# Altium PCB SENSEI_Debug-Board.PcbDoc (part 1 of 2)
Units mm, origin at the board's own origin, x right, y up, seen from the top; angles counter-clockwise.
Board outline 148 x 140 mm, 4 copper layers (Top Layer, GND/PWR1, GND/PWR2, Bottom Layer), stack 0.626 mm thick; 55 components, 116 nets, 460 pads, 677 vias.
Unrouted connection lines stored in the file: 54.
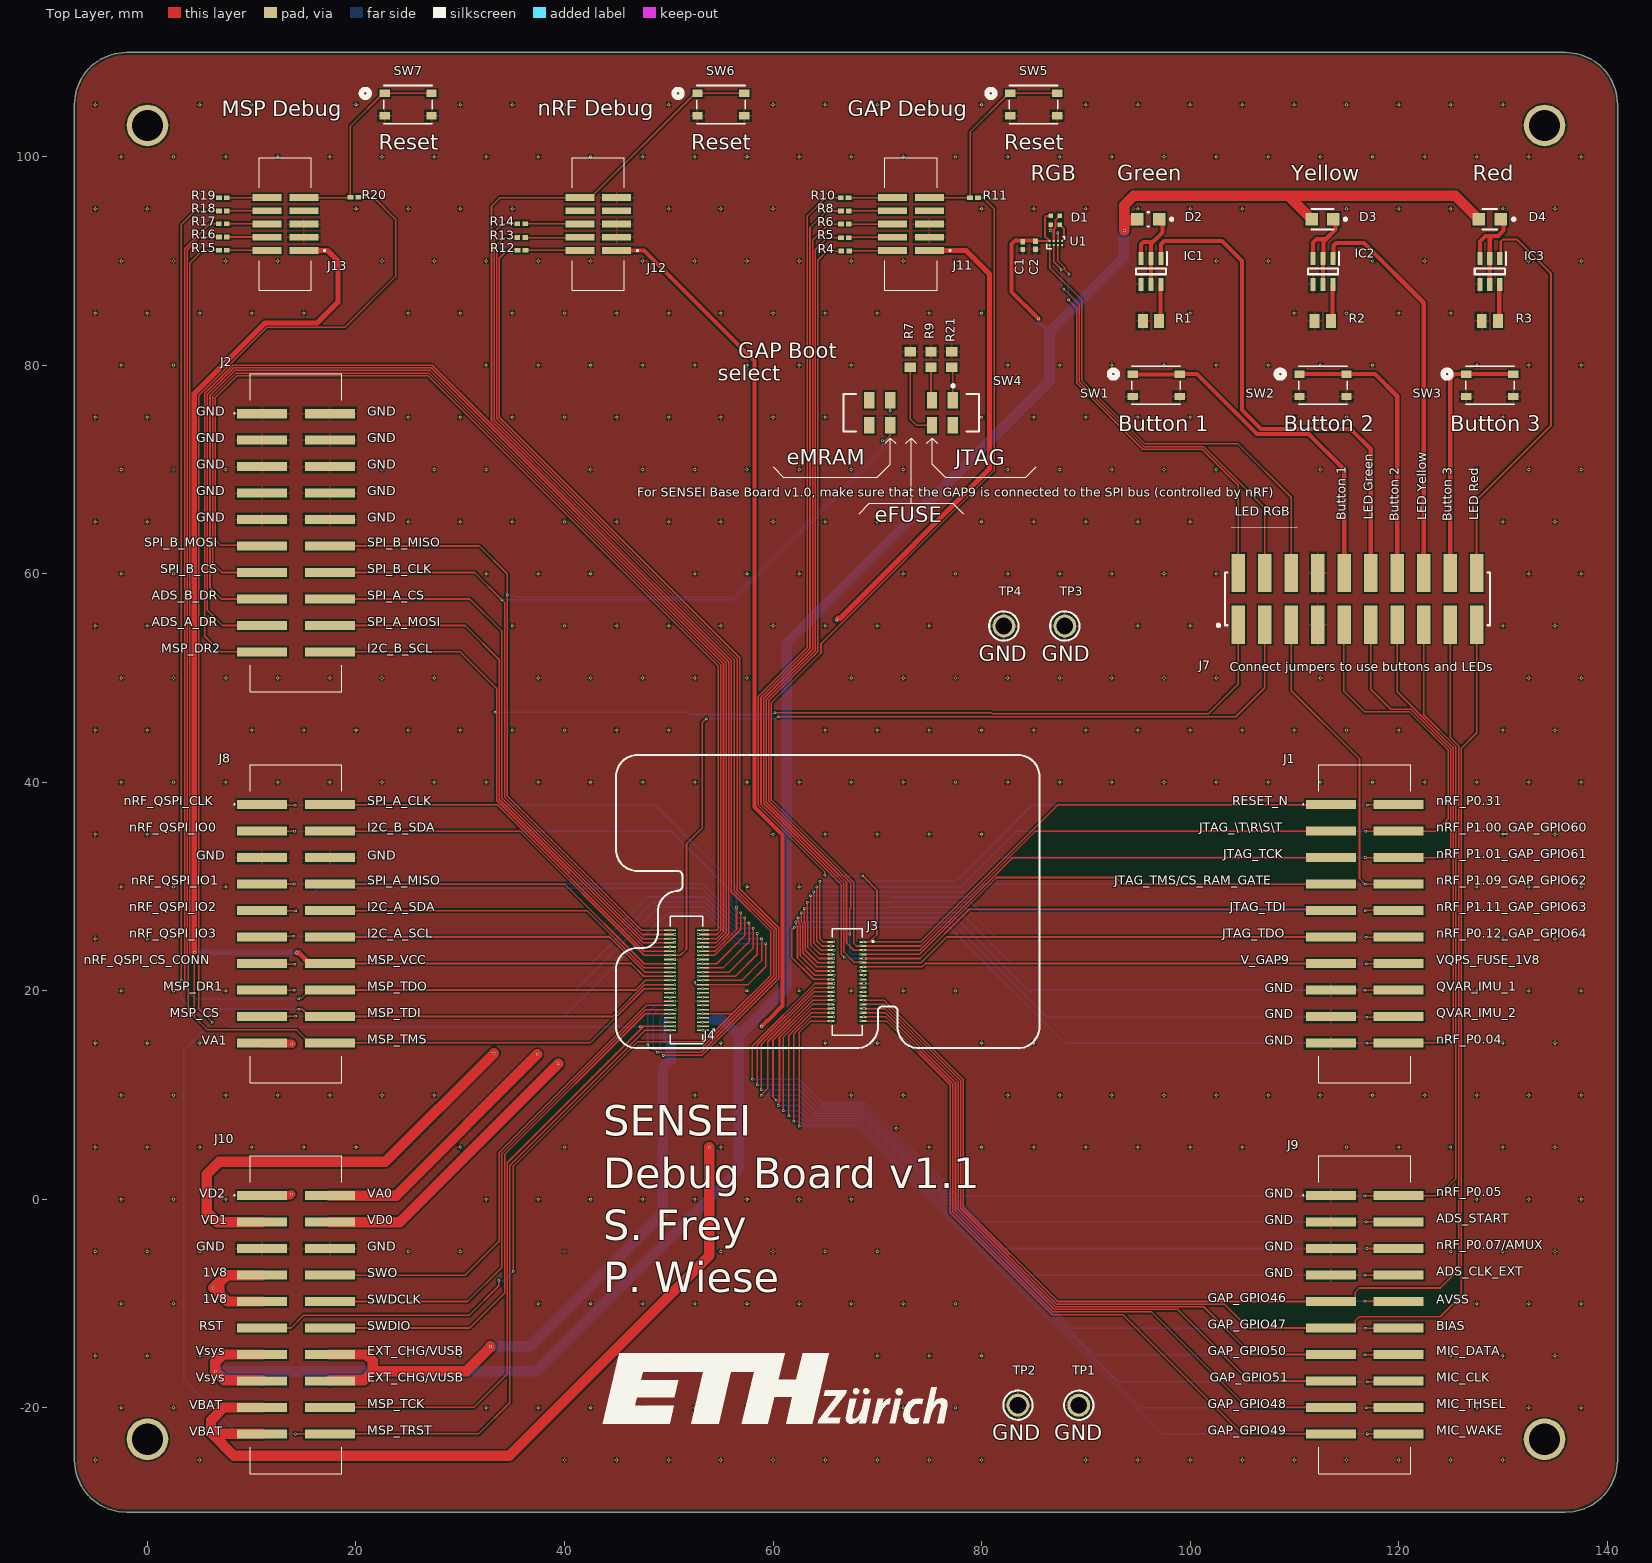
[diagram p0: Top Layer view]
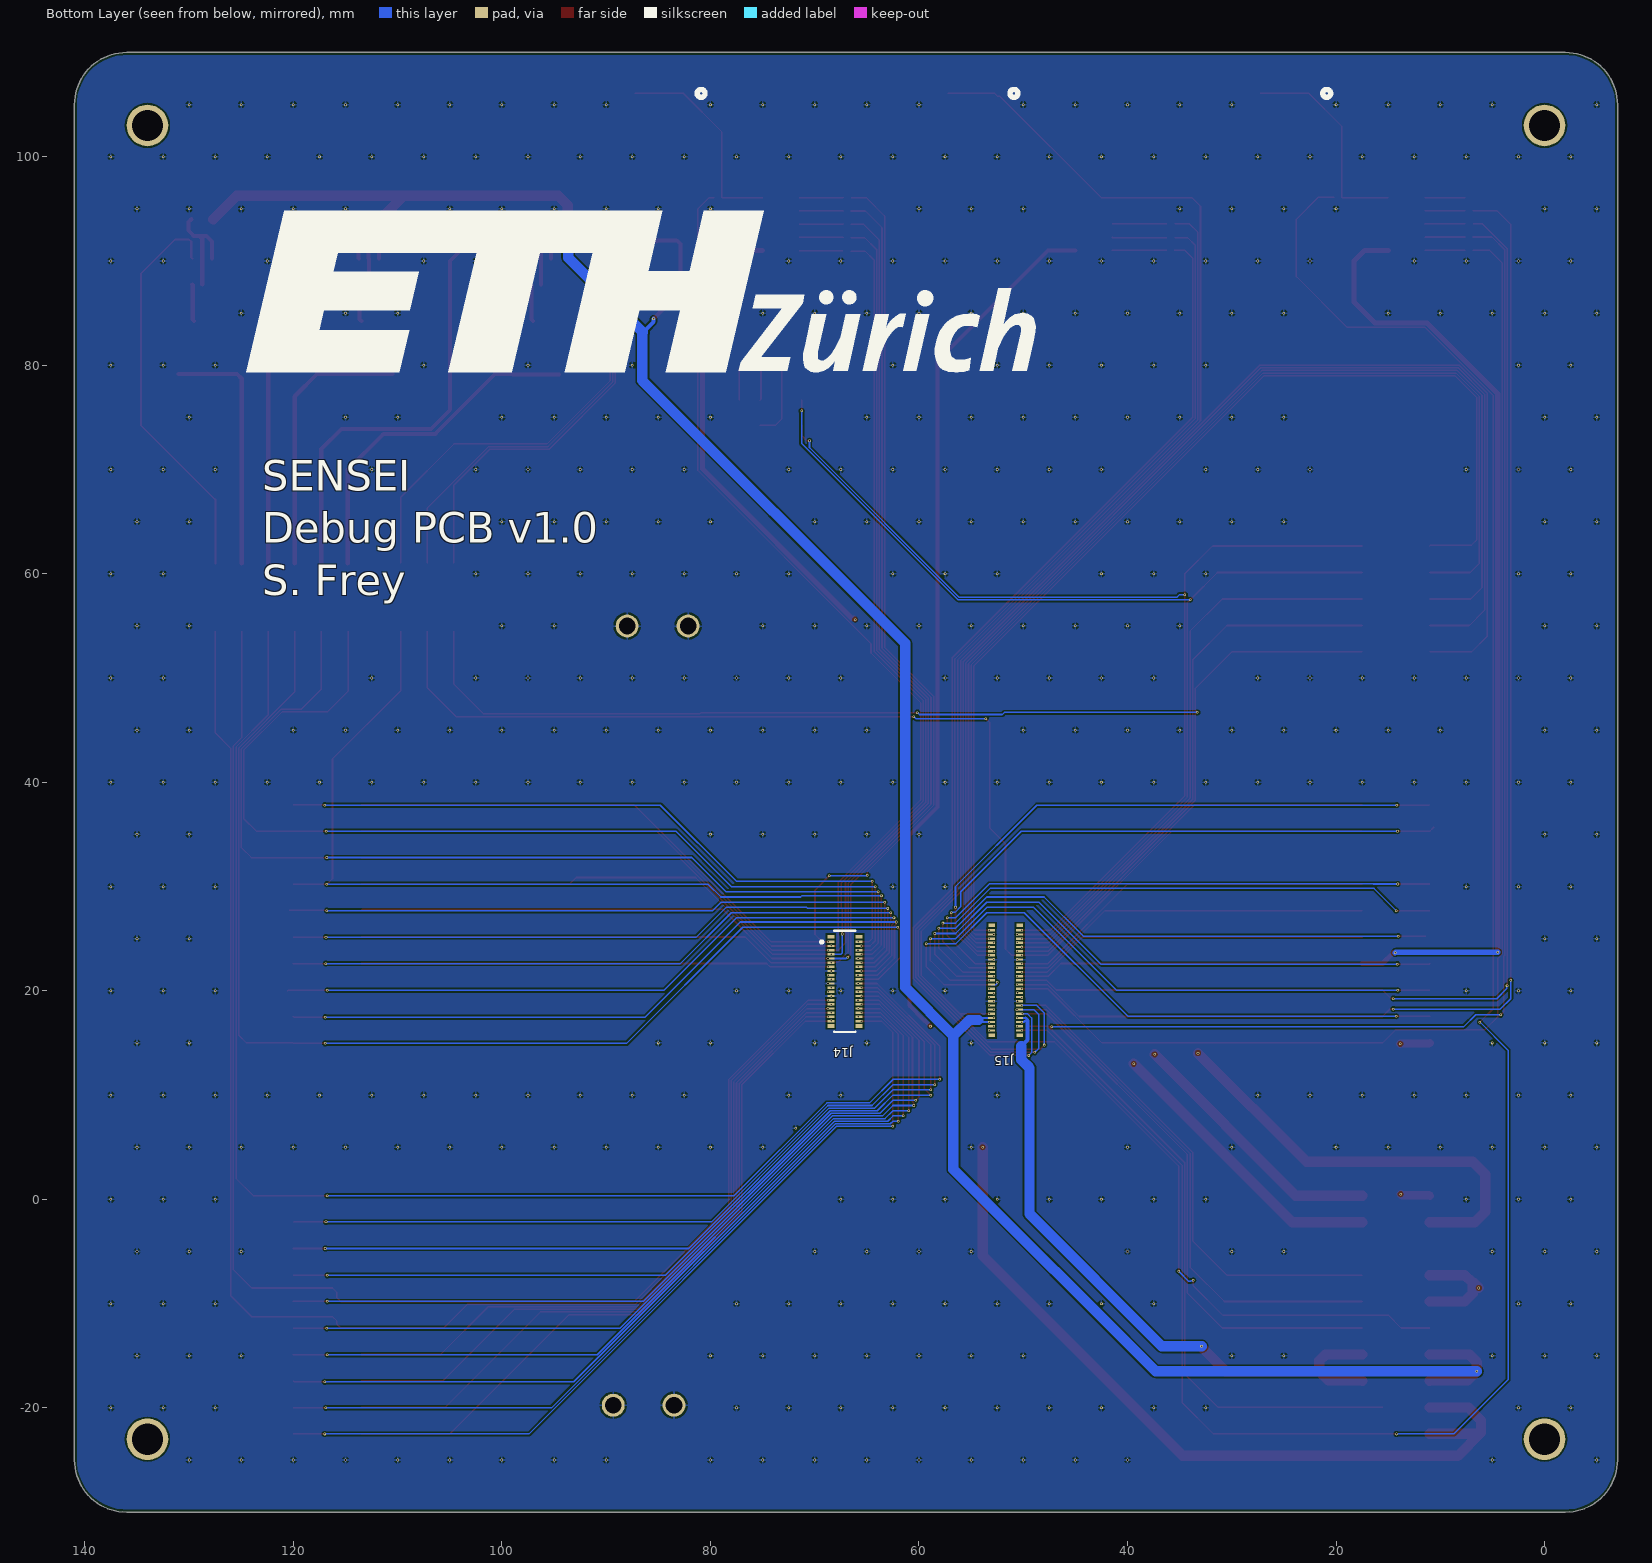
[diagram p1: Bottom Layer view, seen from below]
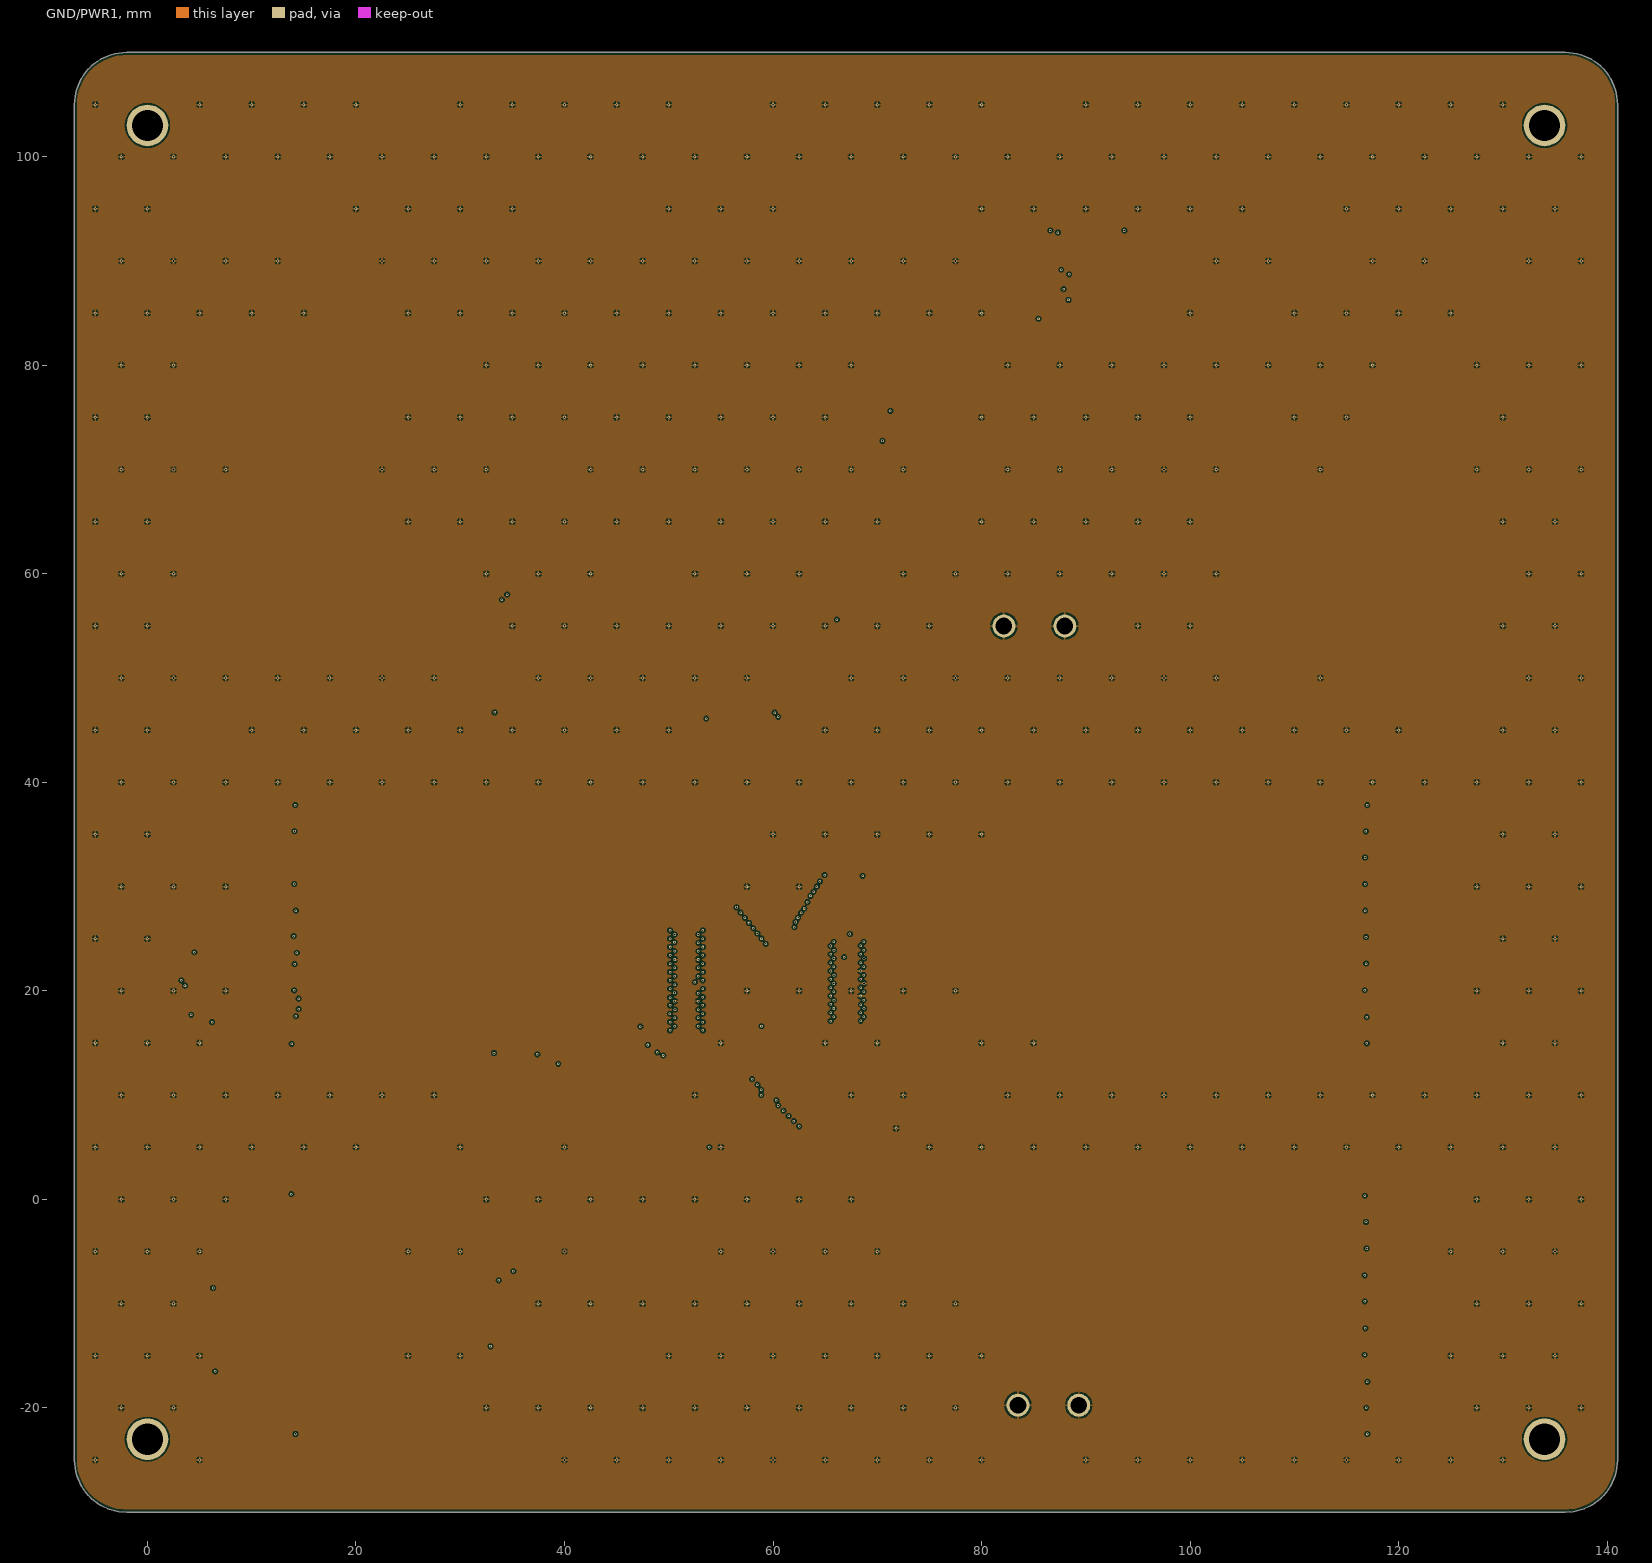
[diagram p2: GND/PWR1]
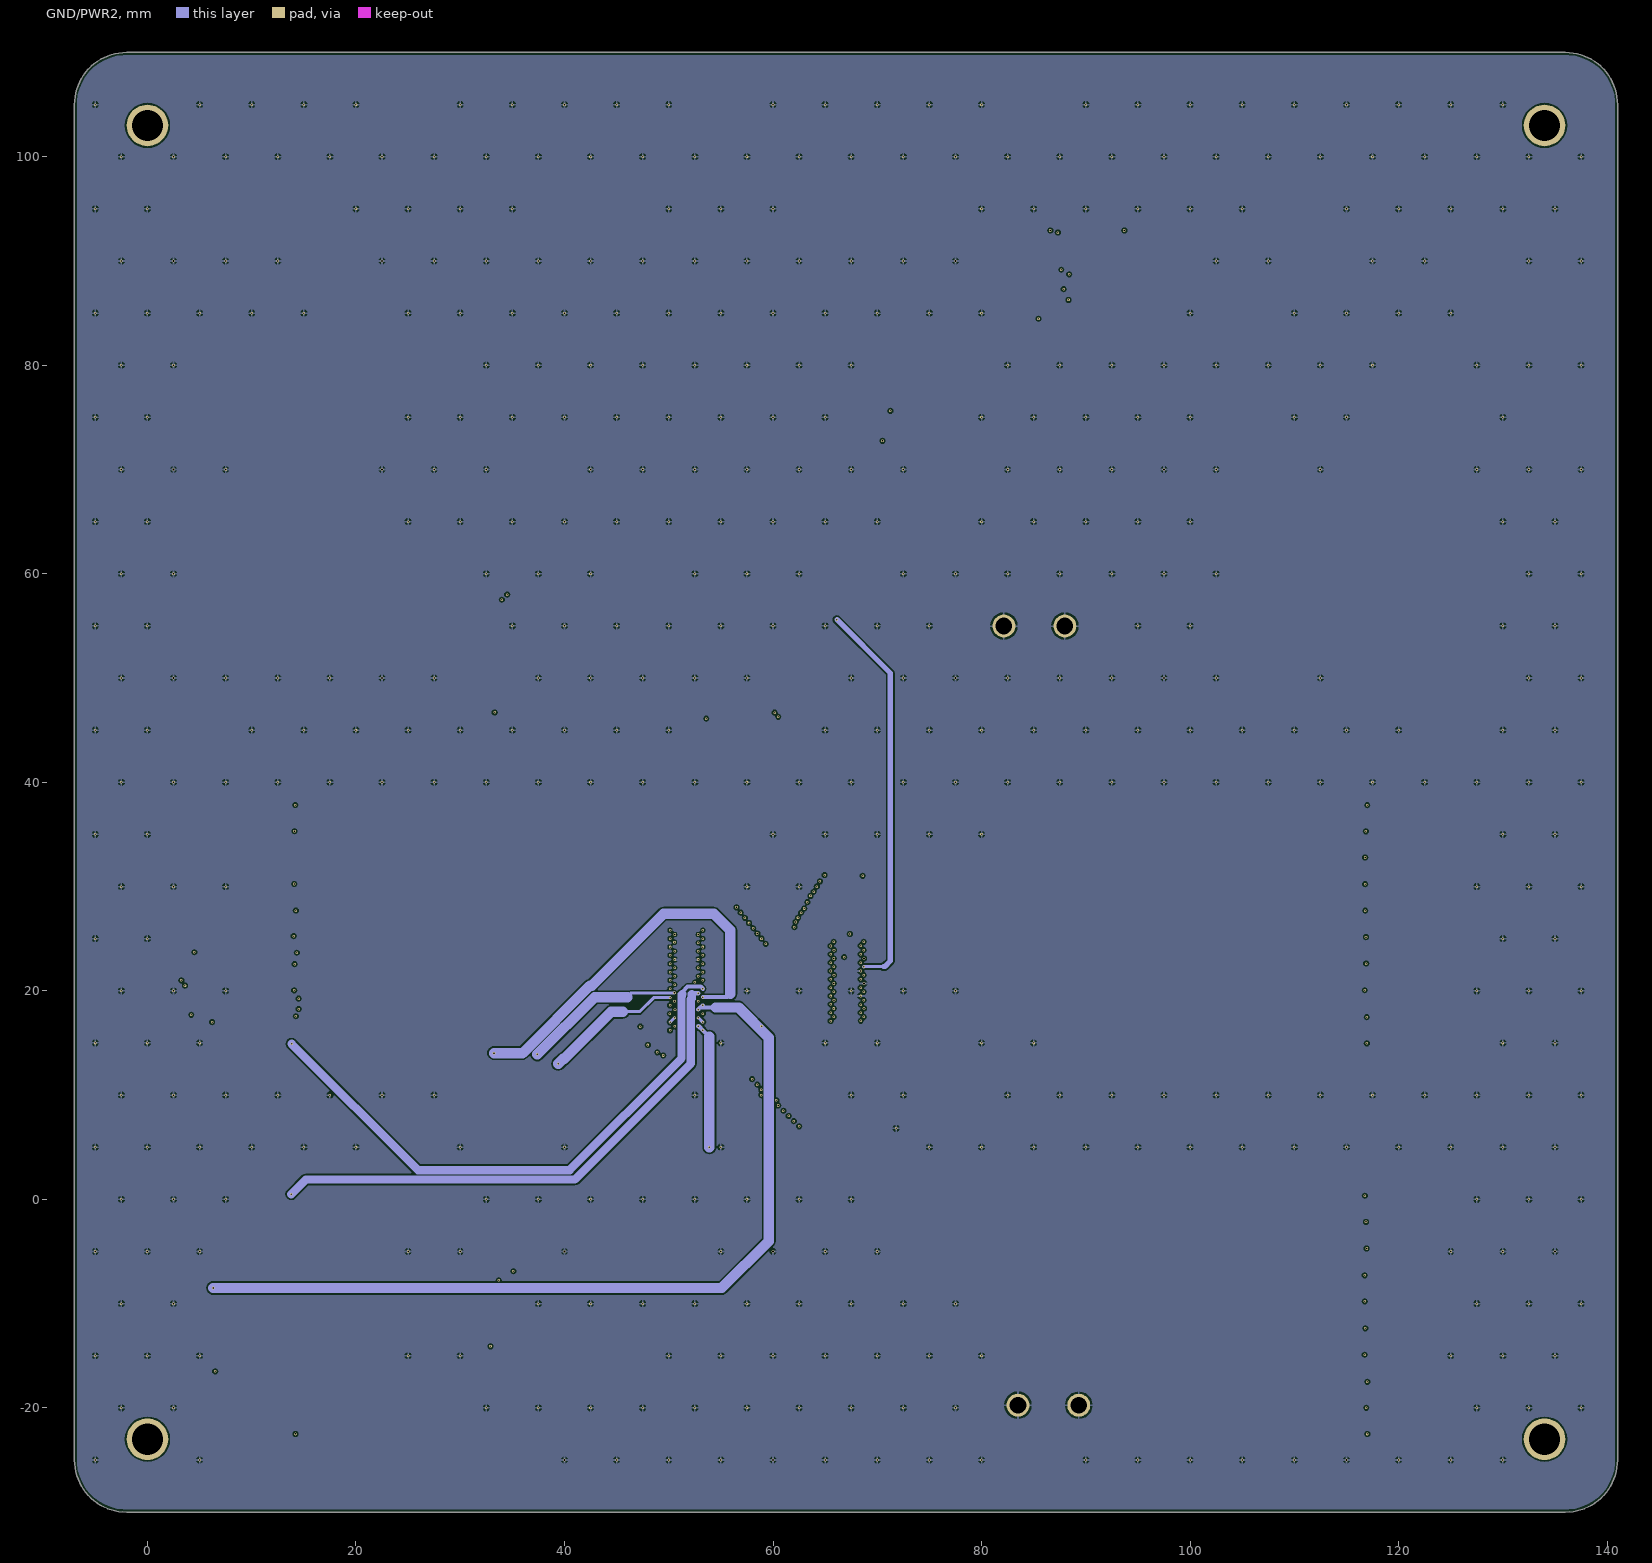
[diagram p3: GND/PWR2]
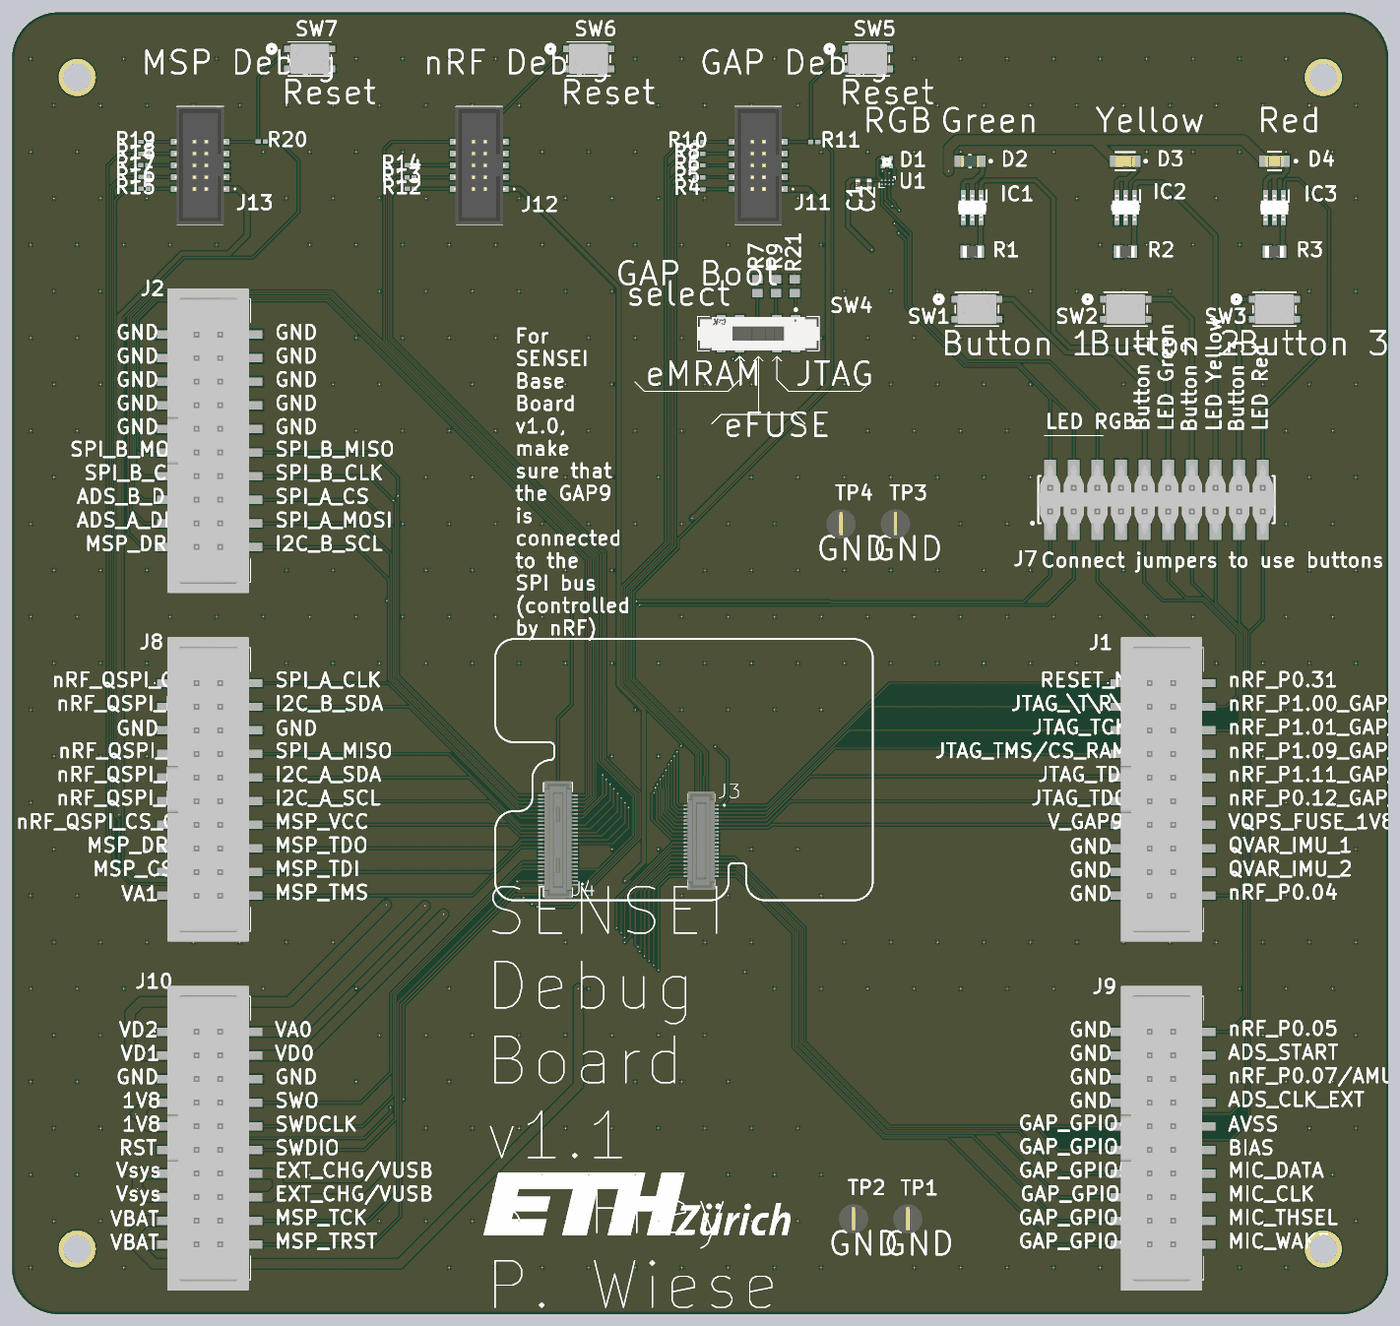
[diagram p5: 3D render of the assembled board from above, using the file's embedded part models]

## Layer stack, top to bottom
Top Solder: solder mask 0.0102, Solder Resist, Dk 3.5
Top Layer: signal copper 0.0175
Dielectric1: prepreg 0.13, PP-021, Dk 4.27
GND/PWR1: signal copper 0.0356
Dielectric2: core 0.13, Core-023, Dk 4.6
Dielectric 3: core 0.13, Core-023, Dk 4.6
GND/PWR2: signal copper 0.0356
Dielectric 4: prepreg 0.13, PP-021, Dk 4.27
Bottom Layer: signal copper 0.0175
Board Layer Stack Bottom Solder: solder mask 0.0102, Solder Resist, Dk 3.5

## Board outline
-2,-30 cw(c-2,-25) -7,-25 -7,105 cw(c-2,105) -2,110 136,110 cw(c136,105) 141,105 141,-25 cw(c136,-25) 136,-30

## Design rules (kind name [scope] priority, off if disabled: settings)
BoardOutlineClearance [All] p1: gap=0.25 ignorepadtopadclearanceinfootprint=FALSE except(0: Arc-SplitContinuation Track-SplitContinuation SMDPad-SplitContinuation THPad-SplitContinuation Via-SplitContinuation Fill-SplitContinuation Poly-SplitContinuation Region-SplitContinuation Text-SplitContinuation)
Clearance Clearance_D100_CLK [InNetClass('CSI2_CLK') vs Not( InNetClass('CSI2_CLK') OR InNet('GND'))] p1: gap=0.4 ignorepadtopadclearanceinfootprint=TRUE
Clearance Clearance_D100_DATA [InNetClass('CSI2_DATA') vs Not( InNetClass('CSI2_DATA') OR InNet('GND'))] p2: gap=0.4 ignorepadtopadclearanceinfootprint=TRUE
Clearance Clearance_S50 [InNetClass('50Ohm') vs Not( InNetClass('50Ohm') OR InNet('GND') or Keepout )] p3: gap=0.4 ignorepadtopadclearanceinfootprint=TRUE
Clearance Clearance-xPP-xTP-xTT [All] p4: gap=0.1 ignorepadtopadclearanceinfootprint=TRUE except(0.15: Arc-Fill Arc-Poly Arc-Region Track-Fill Track-Poly Track-Region SMDPad-Fill SMDPad-Poly SMDPad-Region THPad-Fill THPad-Poly THPad-Region Via-Fill Via-Poly Via-Region Fill-Fill Fill-Poly Fill-Region Poly-Poly Poly-Region Region-Region)
ComponentClearance ComponentClearance_Mechanical [OnMechanical] p1: gap=0 collisioncheckmode=3 verticalgap=0 showdistances=FALSE
ComponentClearance [All] p2: gap=0.1 collisioncheckmode=3 verticalgap=0.1 showdistances=FALSE
DiffPairsRouting [All] p1: maxlimit=0.25 minlimit=0.15 mostfreqgap=0.25 toplayer_minwidth=0.15 toplayer_maxwidth=0.4 toplayer_prefwidth=0.2 midlayer3_mingap=0.25 midlayer3_minwidth=0.381 midlayer3_maxwidth=0.381 midlayer3_prefwidth=0.381 midlayer4_minwidth=0.15 midlayer4_maxwidth=0.4 midlayer4_prefwidth=0.2 bottomlayer_minwidth=0.15 bottomlayer_maxwidth=0.4 bottomlayer_prefwidth=0.2 maxuncoupledlength=12.5
Height [All] p1: minheight=0 maxheight=25 prefheight=12.5
HoleSize HoleSize-VIA [IsVia] p1: absolutevalues=TRUE maxlimit=6.2 minlimit=0.15 maxpercent=80.000 minpercent=20.000
HoleSize HoleSize-PTH [All] p2: absolutevalues=TRUE maxlimit=6.2 minlimit=0.2 maxpercent=80.000 minpercent=20.000
HoleToHoleClearance [All] p1: gap=0.3 allowstackedmicrovias=FALSE
MatchedLengths MatchedLengths_D100_InPair [InDifferentialPairClass('100Ohm')] p1: tolerance=0.1 checknetsindiffpair=TRUE checkdiffpairvsdiffpair=FALSE checkxsignals=FALSE checkothers=FALSE
MatchedLengths MatchedLengths_D100 [InDifferentialPairClass('100Ohm')] p2: tolerance=0.2 checknetsindiffpair=FALSE checkdiffpairvsdiffpair=TRUE checkxsignals=TRUE checkothers=TRUE
MaximumViaCount MaximumViaCount_D100 [InDifferentialPairClass('100Ohm')] p1: limit=2
MinimumSolderMaskSliver [All] p1: minsoldermaskwidth=0.08
PlaneClearance PlaneClearance-IPI [All] p1: clearance=0.25
PlaneConnect [All] p1: planeconnectstyle=Relief reliefexpansion=0.175 reliefentries=4 reliefconductorwidth=0.2 reliefairgap=0.2
PolygonConnect PolygonConnect-xTW [All] p1: connectstyle=Relief reliefconductorwidth=0.2 reliefentries=4 polygonreliefangle="90 Angle" airgapwidth=0.2
ReturnPath ReturnPath_S50 [InNetClass('50Ohm')] p1: impedanceprofileid={A2B40DEE-A9E4-4B6C-8169-857D678A89D5} _gaplimit=2.3
ReturnPath ReturnPath_D100 [InDifferentialPairClass('100Ohm')] p2: impedanceprofileid={66C9644C-2042-4FCB-B803-7A79EBC78C8C} _gaplimit=2.3
RoutingCorners [All] p1: cornerstyle=45-Degree minsetback=2.5 maxsetback=2.5
RoutingVias [All] p1: holewidth=0.15 width=0.25 viastyle="Through Hole" minholewidth=0.15 minwidth=0.25 maxholewidth=0.15 maxwidth=0.25 // finishet hole size <= 0.45mm
SilkToSilkClearance [All] p1: silktosilkclearance=0
SilkToSolderMaskClearance SilkscreenOverComponentPads [IsPad] p1: minsilkscreentomaskgap=0.05 clearancetoexposedcopper=TRUE
SolderMaskExpansion SolderMaskExpansion_VIA [(ObjectKind = 'Via')] p1: expansion=0 istentingtop=TRUE
SolderMaskExpansion [All] p2: expansion=0 istentingtop=FALSE
UnRoutedNet [All] p1: checkbadconnections=TRUE
Width Width_S50 [InNetClass('50Ohm')] p1: maxlimit=0.305 minlimit=0.104 preferedwidth=0.246 bottomlayer_minwidth=0.178 impedanceprofiledriven=TRUE impedanceprofileid={A2B40DEE-A9E4-4B6C-8169-857D678A89D5} impedanceprofilevalue=50.000000 minimp=50.000000 maximp=50.000000 favimp=50.000000
Width Width-xTW [All] p2: maxlimit=5 minlimit=0.1 preferedwidth=0.1 minimp=50.000000 maximp=50.000000 favimp=50.000000
Width [InNetClass('Power')] p3: maxlimit=5 minlimit=0.15 preferedwidth=0.254 toplayer_prefwidth=0.2 midlayer3_minwidth=0.254 midlayer4_prefwidth=0.2 bottomlayer_prefwidth=0.2 minimp=50.000000 maximp=50.000000 favimp=50.000000
18 further rules are at their usual default settings.

## Classes and differential pairs
net class CSI2_DATA: CSI_D0_N CSI_D0_P
net class CSI2_CLK: CSI_CLK_N CSI_CLK_P

## Components (designator, comment, footprint, x,y, rotation, side; value= is the part's Value field where it differs from the comment)
C1 "CL05A105KP5NNNC" FP-CL511-IPC_C 83.95,91.475 r270 top
C2 "CL05A104KA5NNNC" FP-CL278-IPC_C 85.175,91.5 r270 top
D1 "SML-LX0404SIUPGUSB" SML-LX0404SIUPGUSB 87.075,93.9 r0 top
D2 "LTST-C170GKT" FP-LTST-C170GKT-MFG 96,94 r180 top
D3 "LTST-C170YKT" FP-LTST-C170YKT-MFG 112.7,94 r180 top
D4 "LTST-C170EKT" FP-LTST-C170AKT-MFG 128.75,94 r180 top
IC1 "NCR421UX" SOT95P275X110-6N 96.25,89 r270 top
IC2 "NCR421UX" SOT95P275X110-6N 112.75,89 r270 top
IC3 "NCR421UX" SOT95P275X110-6N 128.75,89 r270 top
J1 "3020-20-0300-00" 302020030000 116.6,26.43 r270 top
J2 "3020-20-0300-00" 302020030000 14.1,63.93 r270 top
J3 "DF40HC(3.0)-40DS-0.4V(51)" DF40HC3040DS04V51 67.1,20.9 r270 top locked
J4 "DF40HC(3.0)-50DS-0.4V(51)" DF40HC3050DS04V51 51.7,21 r90 top locked
J7 "TSM-110-01-T-DV" SMTC-TSM-110-01-X-DV 116.06,57.6 r0 top
J8 "3020-20-0300-00" 302020030000 14.1,26.43 r270 top
J9 "3020-20-0300-00" 302020030000 116.6,-11.07 r270 top
J10 "3020-20-0300-00" 302020030000 14.1,-11.07 r270 top
J11 "3220-10-0300-00-TR" 322010030000TR 73.235,93.54 r90 top
J12 "3220-10-0300-00-TR" 322010030000TR 43.235,93.54 r90 top
J13 "3220-10-0300-00-TR" 322010030000TR 13.235,93.54 r90 top
J14 "DF40C-40DP-0.4V(51)" FP-DF40C-40DP-0_4V_51-MFG 67.1,20.9 r270 bottom locked
J15 "DF40C-50DP-0.4V(51)" CONN_COMBI_50P 51.7,21 r0 bottom locked
R1 "RR1220Q-680-D" FP-RR1220-IPC_C 96.25,84.25 r0 top
R2 "RR1220Q-680-D" FP-RR1220-IPC_C 112.724,84.25 r0 top
R3 "RR1220Q-680-D" FP-RR1220-IPC_C 128.75,84.25 r0 top
R4 "CRCW0201220RFKED" RESC0603X28X15ML05T05 66.925,90.95 r180 top value=220R
R5 "CRCW0201220RFKED" RESC0603X28X15ML05T05 66.9,92.24 r180 top value=220R
R6 "CRCW0201220RFKED" RESC0603X28X15ML05T05 66.9,93.54 r180 top value=220R
R7 "RK73B1JTTD562J" RESC1608X55X30ML20T10 73.154,80.55 r270 top
R8 "CRCW0201220RFKED" RESC0603X28X15ML05T05 66.9,94.79 r180 top value=220R
R9 "RK73B1JTTD562J" RESC1608X55X30ML20T10 75.154,80.55 r270 top
R10 "CRCW0201220RFKED" RESC0603X28X15ML05T05 66.875,96.065 r180 top value=220R
R11 "CRCW0201220RFKED" RESC0603X28X15ML05T05 79.275,96.065 r0 top value=220R
R12 "CRCW0201220RFKED" RESC0603X28X15ML05T05 35.875,91.02 r180 top value=220R
R13 "CRCW0201220RFKED" RESC0603X28X15ML05T05 35.85,92.245 r180 top value=220R
R14 "CRCW0201220RFKED" RESC0603X28X15ML05T05 35.85,93.57 r180 top value=220R
R15 "CRCW0201220RFKED" RESC0603X28X15ML05T05 7.245,91.025 r180 top value=220R
R16 "CRCW0201220RFKED" RESC0603X28X15ML05T05 7.245,92.3 r180 top value=220R
R17 "CRCW0201220RFKED" RESC0603X28X15ML05T05 7.22,93.575 r180 top value=220R
R18 "CRCW0201220RFKED" RESC0603X28X15ML05T05 7.245,94.8 r180 top value=220R
R19 "CRCW0201220RFKED" RESC0603X28X15ML05T05 7.245,96.075 r180 top value=220R
R20 "CRCW0201220RFKED" RESC0603X28X15ML05T05 19.845,96.1 r0 top value=220R
R21 "RK73B1JTTD562J" RESC1608X55X30ML20T10 77.154,80.55 r270 top
SW1 "PTS815 SJM 250 SMTR LFS" "SW4_PTS815 SJM 250 SMTR LFS_CNK" 96.75,78.075 r0 top
SW2 "PTS815 SJM 250 SMTR LFS" "SW4_PTS815 SJM 250 SMTR LFS_CNK" 112.75,78.075 r0 top
SW3 "PTS815 SJM 250 SMTR LFS" "SW4_PTS815 SJM 250 SMTR LFS_CNK" 128.75,78.075 r0 top
SW4 "JS203011JCQN" FP-JS203011JCQN-MFG 73.25,75.45 r180 top
SW5 "PTS815 SJM 250 SMTR LFS" "SW4_PTS815 SJM 250 SMTR LFS_CNK" 85,105 r0 top
SW6 "PTS815 SJM 250 SMTR LFS" "SW4_PTS815 SJM 250 SMTR LFS_CNK" 55,105 r0 top
SW7 "PTS815 SJM 250 SMTR LFS" "SW4_PTS815 SJM 250 SMTR LFS_CNK" 25,105 r0 top
TP1 "TP THT" TEST_POINT_KEYSTONE_5007_TRAD 89.325,-19.75 r0 top
TP2 "TP THT" TEST_POINT_KEYSTONE_5007_TRAD 83.493,-19.74 r0 top
TP3 "TP THT" TEST_POINT_KEYSTONE_5007_TRAD 87.992,54.985 r0 top
TP4 "TP THT" TEST_POINT_KEYSTONE_5007_TRAD 82.142,54.985 r0 top
U1 "IS31FL3194-CLS2-TR" WLCSP_8_P0.4 86.525,91.525 r90 top

## Footprints (in the part's own frame and the unit in brackets; to place one, negate y for a bottom-side part, rotate by r counter-clockwise, add the part's x,y. Pads: shape width x height; smd on the part's side, far side on the other; paste and mask are expansions set on the pad)
302020030000 [mm]
  rect 0.89x4.8 smd: 1(-11.43,-3.1) 2(-11.43,3.4) 3(-8.89,-3.1) 4(-8.89,3.4) 5(-6.35,-3.1) 6(-6.35,3.4) 7(-3.81,-3.1) 8(-3.81,3.4) 9(-1.27,-3.1) 10(-1.27,3.4) 11(1.27,-3.1) 12(1.27,3.4) 13(3.81,-3.1) 14(3.81,3.4) 15(6.35,-3.1) 16(6.35,3.4) 17(8.89,-3.1) 18(8.89,3.4) 19(11.43,-3.1) 20(11.43,3.4)
  silkscreen extent -15.24,-5.8 15.24,4.55, body extent -16.38,-4.38 16.38,4.38, height 12.59
322010030000TR [mm]
  rect 0.65x2.77 smd: 1(-2.54,-1.765) 2(-2.54,1.765) 3(-1.27,-1.765) 4(-1.27,1.765) 5(0,-1.765) 6(0,1.765) 7(1.27,-1.765) 8(1.27,1.765) 9(2.54,-1.765) 10(2.54,1.765)
  silkscreen extent -6.35,-3.8 6.35,2.5, body extent -6.32,-2.75 6.32,2.75, height 5.61
CONN_COMBI_50P [mm] "50Pin 0.4mm pitch connector footprint that accepts (male) connectors intended for different stacking heights:  Hirose - DF40C-50DP-0.4V(51) for 1.5mm - 3mm stacking height , JAE - WP7B-P050VA1-R8000 - for 0.7mm stacking height"
  rect 0.66x0.22 smd: 1(1.355,4.8) 2(1.355,4.4) 3(1.355,4) 4(1.355,3.6) 5(1.355,3.2) 6(1.355,2.8) 7(1.355,2.4) 8(1.355,2) 9(1.355,1.6) 10(1.355,1.2) 11(1.355,0.8) 12(1.355,0.4) 13(1.355,0) 14(1.355,-0.4) 15(1.355,-0.8) 16(1.355,-1.2) 17(1.355,-1.6) 18(1.355,-2) 19(1.355,-2.4) 20(1.355,-2.8) 21(1.355,-3.2) 22(1.355,-3.6) 23(1.355,-4) 24(1.355,-4.4) 25(1.355,-4.8) 26(-1.355,-4.8) 27(-1.355,-4.4) 28(-1.355,-4) 29(-1.355,-3.6) 30(-1.355,-3.2) 31(-1.355,-2.8) 32(-1.355,-2.4) 33(-1.355,-2) 34(-1.355,-1.6) 35(-1.355,-1.2) 36(-1.355,-0.8) 37(-1.355,-0.4) 38(-1.355,0) 39(-1.355,0.4) 40(-1.355,0.8) 41(-1.355,1.2) 42(-1.355,1.6) 43(-1.355,2) 44(-1.355,2.4) 45(-1.355,2.8) 46(-1.355,3.2) 47(-1.355,3.6) 48(-1.355,4) 49(-1.355,4.4) 50(-1.355,4.8)
  rect 0.65x0.35 smd: 56(-1.375,-5.275) 56(-1.375,5.275) 56(1.325,-5.275) 56(1.325,5.275)
  body extent -1.49,-5.74 1.48,5.78, height 1.14
DF40HC3040DS04V51 [mm]
  rect 0.2x0.7 smd: 1(-3.8,1.54) 2(-3.8,-1.54) 3(-3.4,1.54) 4(-3.4,-1.54) 5(-3,1.54) 6(-3,-1.54) 7(-2.6,1.54) 8(-2.6,-1.54) 9(-2.2,1.54) 10(-2.2,-1.54) 11(-1.8,1.54) 12(-1.8,-1.54) 13(-1.4,1.54) 14(-1.4,-1.54) 15(-1,1.54) 16(-1,-1.54) 17(-0.6,1.54) 18(-0.6,-1.54) 19(-0.2,1.54) 20(-0.2,-1.54) 21(0.2,1.54) 22(0.2,-1.54) 23(0.6,1.54) 24(0.6,-1.54) 25(1,1.54) 26(1,-1.54) 27(1.4,1.54) 28(1.4,-1.54) 29(1.8,1.54) 30(1.8,-1.54) 31(2.2,1.54) 32(2.2,-1.54) 33(2.6,1.54) 34(2.6,-1.54) 35(3,1.54) 36(3,-1.54) 37(3.4,1.54) 38(3.4,-1.54) 39(3.8,1.54) 40(3.8,-1.54)
  silkscreen extent -5.05,-1.44 5.15,2.55, body extent -5.3,-1.69 5.3,1.69, height 2.89
DF40HC3050DS04V51 [mil]
  rect 6x44.56 smd paste+0 mask+0: 1(-188.98,-62) 2(-173.23,-62) 3(-157.48,-62) 4(-141.73,-62) 5(-125.98,-62) 6(-110.24,-62) 7(-94.49,-62) 8(-78.74,-62) 9(-62.99,-62) 10(-47.24,-62) 11(-31.5,-62) 12(-15.75,-62) 13(0,-62) 14(15.75,-62) 15(31.5,-62) 16(47.24,-62) 17(62.99,-62) 18(78.74,-62) 19(94.49,-62) 20(110.24,-62) 21(125.98,-62) 22(141.73,-62) 23(157.48,-62) 24(173.23,-62) 25(188.98,-62) 26(188.98,62) 27(173.23,62) 28(157.48,62) 29(141.73,62) 30(125.98,62) 31(110.24,62) 32(94.49,62) 33(78.74,62) 34(62.99,62) 35(47.24,62) 36(31.5,62) 37(15.75,62) 38(0,62) 39(-15.75,62) 40(-31.5,62) 41(-47.24,62) 42(-62.99,62) 43(-78.74,62) 44(-94.49,62) 45(-110.24,62) 46(-125.98,62) 47(-141.73,62) 48(-157.48,62) 49(-173.23,62) 50(-188.98,62)
  silkscreen extent -239,-104 242,61, body extent -248,-67 248,67, height 114
FP-CL278-IPC_C [mm]
  rect 0.515x0.472 smd paste+0 mask+0: 1(-0.379,0) 2(0.379,0)
  body extent -0.74,-0.38 0.74,0.38, height 0.25
FP-CL511-IPC_C [mm]
  rect 0.515x0.472 smd paste+0 mask+0: 1(-0.379,0) 2(0.379,0)
  body extent -0.74,-0.38 0.74,0.38, height 0.25
FP-DF40C-40DP-0_4V_51-MFG [mm]
  rect 0.23x0.66 smd paste-1000 mask+0: 1(-3.8,-1.355) 2(-3.8,1.355) 3(-3.4,-1.355) 4(-3.4,1.355) 5(-3,-1.355) 6(-3,1.355) 7(-2.6,-1.355) 8(-2.6,1.355) 9(-2.2,-1.355) 10(-2.2,1.355) 11(-1.8,-1.355) 12(-1.8,1.355) 13(-1.4,-1.355) 14(-1.4,1.355) 15(-1,-1.355) 16(-1,1.355) 17(-0.6,-1.355) 18(-0.6,1.355) 19(-0.2,-1.355) 20(-0.2,1.355) 21(0.2,-1.355) 22(0.2,1.355) 23(0.6,-1.355) 24(0.6,1.355) 25(1,-1.355) 26(1,1.355) 27(1.4,-1.355) 28(1.4,1.355) 29(1.8,-1.355) 30(1.8,1.355) 31(2.2,-1.355) 32(2.2,1.355) 33(2.6,-1.355) 34(2.6,1.355) 35(3,-1.355) 36(3,1.355) 37(3.4,-1.355) 38(3.4,1.355) 39(3.8,-1.355) 40(3.8,1.355)
  rect 0.35x0.66 smd paste+0 mask+0: 41(-4.275,1.355) 42(4.275,1.355) 43(-4.275,-1.355) 44(4.275,-1.355)
  silkscreen extent -4.86,-2.35 4.86,1.03, body extent -4.76,-1.49 4.76,1.49, height 1.29
FP-JS203011JCQN-MFG [mm]
  rect 1x1.6 smd paste+0 mask+0: 1(-4,-1.2) 2(-2,-1.2) 3(2,-1.2) 4(4,-1.2) 5(-4,1.2) 6(-2,1.2) 7(2,1.2) 8(4,1.2)
  silkscreen extent -6.5,-2.7 6.5,1.8, body extent -6.6,-2.1 6.6,2.1, height 0.25
FP-LTST-C170AKT-MFG [mm]
  rect 1.2x1.2 smd paste+0 mask+0: 1(-1.05,0) 2(1.05,0)
  silkscreen extent -2.43,-1 0.7,1, body extent -1.75,-0.77 1.75,0.77, height 0.25
FP-LTST-C170GKT-MFG [mm]
  rect 1.2x1.2 smd paste+0 mask+0: 1(-1.05,0) 2(1.05,0)
  silkscreen extent -2.35,-0.68 0.07,0.67, body extent -1.75,-0.77 1.75,0.77, height 0.25
FP-LTST-C170YKT-MFG [mm]
  rect 1.2x1.2 smd paste+0 mask+0: 1(-1.05,0) 2(1.05,0)
  silkscreen extent -2.33,-0.98 1.05,0.97, body extent -1.75,-0.77 1.75,0.77, height 0.25
FP-RR1220-IPC_C [mm]
  rect 0.955x1.356 smd paste+0 mask+0: 1(-0.776,0) 2(0.776,0)
  body extent -1.35,-0.82 1.35,0.82, height 0.25
RESC0603X28X15ML05T05 [mm] "Chip Resistor, 2-Leads, Body 0.60x0.30mm, IPC Low Density"
  rect 0.55x0.45 smd: 1(-0.375,0) 2(0.375,0)
  body extent -0.33,-0.17 0.33,0.18, height 0.28
RESC1608X55X30ML20T10 [mm] "Chip Resistor, 2-Leads, Body 1.60x0.80mm, IPC Low Density"
  rect 0.9x1.1 smd: 1(-0.75,0) 2(0.75,0)
  body extent -0.9,-0.5 0.9,0.5, height 0.55
SML-LX0404SIUPGUSB [mm]
  rrect50% 0.45x0.45 smd: 1(-0.425,0.425)
  rect 0.45x0.45 smd: 2(0.425,0.425) 3(0.425,-0.425) 4(-0.425,-0.425)
  body extent -0.5,-0.5 0.5,0.5, height 0.25
SMTC-TSM-110-01-X-DV [mm] "Double Row Gullwing ASM, 2x10 Pins, Vertical, 2.54mm Pitch, Male"
  rect 1.27x3.68 smd: 1(-11.43,-2.475) 2(-11.43,2.475) 3(-8.89,-2.475) 4(-8.89,2.475) 5(-6.35,-2.475) 6(-6.35,2.475) 7(-3.81,-2.475) 8(-3.81,2.475) 9(-1.27,-2.475) 10(-1.27,2.475) 11(1.27,-2.475) 12(1.27,2.475) 13(3.81,-2.475) 14(3.81,2.475) 15(6.35,-2.475) 16(6.35,2.475) 17(8.89,-2.475) 18(8.89,2.475) 19(11.43,-2.475) 20(11.43,2.475)
  silkscreen extent -13.46,-2.66 12.7,2.54, body extent -12.7,-3.68 12.7,3.68, height 9.65
SOT95P275X110-6N [mm]
  rect 1.25x0.5 smd: 1(-1.25,0.95) 2(-1.25,0) 3(-1.25,-0.95) 4(1.25,-0.95) 5(1.25,0) 6(1.25,0.95)
  silkscreen extent -1.88,-1.45 0.27,1.55, body extent -1.37,-1.47 1.38,1.48, height 1.01
"SW4_PTS815 SJM 250 SMTR LFS_CNK" [mil]
  rect 39x28 smd paste+0 mask+0: 1(-88.58,42.32) 2(88.58,42.32) 3(-88.58,-42.32) 4(88.58,-42.32)
  silkscreen extent -176,-72 92,72, body extent -89,-63 89,63, height 99
TEST_POINT_KEYSTONE_5007_TRAD [mm] "Point de test"
  round 2.2 hole 1.6 paste-5: 1(0,0)
  silkscreen extent -1.4,-1.4 1.4,1.4, body extent -1.59,-1.59 1.59,1.59, height 5.59
WLCSP_8_P0.4 [mm]
  round 0.2 smd mask+0: A1(0,0) A2(0.4,0) B1(0,-0.4) B2(0.4,-0.4) C1(0,-0.8) C2(0.4,-0.8) D1(0,-1.2) D2(0.4,-1.2)
  silkscreen extent -0.37,-1.48 0.77,0.28, body extent -0.3,-1.4 0.7,0.2, height 0.41

## Part data
C1: library part CMP-13271-001936-1, "Cap Ceramic 1uF 10V X5R ±10% SMD 0402 +85°C Paper T/R", Capacitance=1uF, Case Code (Imperial)=0402, Case Code (Metric)=1005, Dielectric=X5R, Max Operating Temperature=85°C, Min Operating Temperature=-55°C, Package Quantity=1, Tolerance=10%, Voltage Rating=10V, Case/Package=0402, Contact Plating=Tin, Depth=0.5mm, Height=0.5mm, Length=1mm, Material=Ceramic, Mount="Surface Mount", Packaging="Tape and Reel", Radiation Hardening=No, Thickness=0.022inch, Width=0.02inch
C2: library part CMP-13271-000728-1, "Cap Ceramic 100nF 25V X5R ±10% SMD 0402 +85°C Paper T/R", Capacitance=0.1uF, Case Code (Imperial)=0402, Case Code (Metric)=1005, Dielectric=X5R, Max Operating Temperature=85°C, Min Operating Temperature=-55°C, Package Quantity=1, Tolerance=10%, Voltage=25V, Case/Package=0402, Depth=0.5mm, Height=0.5mm, Lead Free="Lead Free", Length=1mm, Mount="Surface Mount", Packaging="Tape and Reel", Radiation Hardening=No, Thickness=0.022inch, Voltage Rating=25V, Voltage Rating (DC)=25V, Width=0.02inch
D1: library part D_RGB_LED, "SML-LX0404SIUPGUSB RGB LED", Manufacturer=Lumex, Supplier Part Number 1=696-LX0404SIUPGUSB, Manufacturer Part Number=SML-LX0404SIUPGUSB, Supplier 1=Mouser
D2: library part CMP-1674-00002-6, "LED GREEN CLEAR SMD", Case Code (Imperial)=0805, Case Code (Metric)=2012, Color=Green, Forward Current=30mA, Forward Voltage=2.1V, Lens Color=Colorless, Max Operating Temperature=85°C, Min Operating Temperature=-55°C, Package Quantity=1, Power Dissipation=100mW, Reverse Voltage=5V, Test Current=10mA, Case/Package=0805, Depth=1.25mm, Dominant Wavelength=569nm, Height=1.1mm, Illumination Color=Green, Lead Free="Lead Free", Length=2mm, Lens Style=Diffused, Lens Transparency=Clear, Luminous Intensity=6mcd, Mount="Surface Mount", Number of Elements=1, Number of LEDs=1, Number of Pins=2, Packaging="Tape and Reel", Power Rating=100mW, Radiation Hardening=No, Viewing Angle=130°, Voltage=5V, Wavelength=565nm, Width=1.25mm
D3: library part CMP-1674-00003-7, "LED YELLOW CLEAR SMD", Case Code (Imperial)=0805, Case Code (Metric)=2012, Color=Yellow, Forward Current=20mA, Forward Voltage=2.1V, Lens Color=Colorless, Max Operating Temperature=85°C, Min Operating Temperature=-55°C, Package Quantity=1, Power Dissipation=60mW, Reverse Voltage=5V, Test Current=10mA, Case/Package=0805, Depth=1.6mm, Dominant Wavelength=588nm, Height=1.1mm, Illumination Color=Yellow, Lead Free="Lead Free", Length=3.2mm, Lens Style=Diffused, Lens Transparency=Clear, Luminous Intensity=6mcd, Mount="Surface Mount", Number of Elements=1, Number of LEDs=1, Number of Pins=2, Packaging="Tape and Reel", Power Rating=60mW, Radiation Hardening=No, RoHS Compliant=Yes, Series="CHIPLED 0805", Viewing Angle=130°, Wavelength=585nm, Width=1.25mm
D4: library part CMP-22017-000022-1, "LED RED CLEAR SMD", Case Code (Imperial)=0805, Case Code (Metric)=2012, Color=Red, Forward Current=30mA, Forward Voltage=2.1V, Lens Color=Colorless, Max Operating Temperature=85°C, Max Power Dissipation=100mW, Min Operating Temperature=-55°C, Package Quantity=1, Reverse Voltage=5V, Test Current=10mA, Case/Package=0805, Depth=1.25mm, Dominant Wavelength=621nm, Height=1.1mm, Illumination Color=Red, Lead Free="Lead Free", Length=2mm, Lens Style=Diffused, Lens Transparency=Clear, Luminous Intensity=2mcd, Mount="Surface Mount", Number of Elements=1, Number of LEDs=1, Number of Pins=2, Packaging="Tape and Reel", Power Dissipation=100mW, Radiation Hardening=No, Viewing Angle=130°, Wavelength=630nm, Width=1.25mm
IC1 IC2 IC3: "Integrated Circuit", Manufacturer_Name=Nexperia, Mouser Part Number=771-NCR421UX, Arrow Part Number=NCR421UX, Arrow Price/Stock=https://www.arrow.com/en/products/ncr421ux/nexperia?region=nac, Datasheet Link=https://assets.nexperia.com/documents/data-sheet/NCR420U_NCR421U.pdf, Height=1.1mm, Manufacturer_Part_Number=NCR421UX, Mouser Price/Stock=https://www.mouser.co.uk/ProductDetail/Nexperia/NCR421UX?qs=0lSvoLzn4L8cYO%2FeeNZX1Q%3D%3D
J1 J2 J8 J9 J10 J11 J12 J13: "Connector", Manufacturer_Name="CNC Tech"
  J1 J2 J8 J9 J10: Arrow Part Number=3020-20-0300-00, Arrow Price/Stock=https://www.arrow.com/en/products/3020-20-0300-00/cnc-tech-llc?region=nac, Datasheet Link=http://cnctech.us/pdfs/3020-XX-0300-00.pdf, Height=9mm, Manufacturer_Part_Number=3020-20-0300-00
  J11 J12 J13: Arrow Part Number=3220-10-0300-00-TR, Arrow Price/Stock=https://www.arrow.com/en/products/3220-10-0300-00-tr/cnc-tech-llc?region=nac, Datasheet Link=http://www.cnctech.us/pdfs/3220-XX-0300-00-TR.pdf, Height=5.55mm, Manufacturer_Part_Number=3220-10-0300-00-TR
J3: "40 Position 0.4mm Pitch Dual Row Vertical Surface Mount (SMT) Pin Socket, 3.0mm Stacking Height", Package=None, Availability=Unavailable, MP=DF40HC(3.0)-40DS-0.4V(51), Price=None, System=Connector
J4: "50 Position 0.4mm Pitch Dual Row Vertical Surface Mount (SMT) Pin Socket, 3.0mm Stacking Height", Mfr_Name=Hirose, Copyright="Copyright (C) 2023 Ultra Librarian. All rights reserved.", Manufacturer_Part_Number=DF40HC(3.0)-50DS-0.4V(51), RefDes=RefDes, Type=DEV
J7: library part CMP-1024-00282-1, "0.025\" SQ Post Header, Surface Mount, Vertical, -55 to 105 degC, 2.54 mm Pitch, 20-Pin, Male, RoHS", Manufacturer=Samtec, Temperature Range="-55 to 105 degC", ComponentLink1Description="Manufacturer URL", ComponentLink1URL=http://www.samtec.com, ComponentLink2Description=Datasheet, ComponentLink2URL=http://www.samtec.com/documents/webfiles/pdf/TSM.PDF, ComponentLink3Description="Package Specification", ComponentLink3URL=http://www.samtec.com/documents/webfiles/cpdf/TSM-1XX-XX-XXX-XX-X-XXX-X-MKT.pdf, DatasheetVersion=F-214, Mounting Technology="Surface Mount", Orientation=Vertical, PackageDescription="Double Row Gullwing ASM", PackageReference=TSM-110-01-X-DV, PackageVersion="DJ, 4/1991", PartNumber=TSM-110-01-T-DV, Pitch="2.54 mm", RoHS=True
J14: "50 Position 0.4mm Pitch Dual Row Vertical Surface Mount (SMT) Receptacle", Current Rating=300mA, Max Operating Temperature=85°C, Min Operating Temperature=-35°C, Package Quantity=1, Voltage Rating=30V, Connector Type=Plug, Contact Material=Bronze, Contact Plating=Gold, Gender=Male, Housing Material=Polymer, Lead Free="Lead Free", Mated Stacking Heights=4mm, Mount="Surface Mount", Number of Contacts=40, Number of Positions=40, Number of Rows=2, Orientation=Straight, Packaging="Tape and Reel", Pitch=0.4mm, REACH SVHC="No SVHC", System=Connector, Termination=SMD/SMT
J15: "50 Position 0.4mm Pitch Dual Row Vertical Surface Mount (SMT) Receptacle,", Mfr_Name=Hirose, Copyright="Copyright (C) 2023 Ultra Librarian. All rights reserved.", Manufacturer_Part_Number=DF40C-50DP-0.4V(51), RefDes=RefDes, System=Connector, Type=DEV
R1 R2 R3: library part CMP-2001-03565-2, "68Ω ±0.5% 0.1W 1/10W Chip Resistor 0805 (2012 Metric) Thin Film", Case Code (Imperial)=0805, Case Code (Metric)=2012, Max Operating Temperature=125°C, Max Power Dissipation=100mW, Min Operating Temperature=-55°C, Package Quantity=1, Resistance=68R, Resistor Type="Thin Film", Temperature Coefficient=50ppm/°C, Tolerance=0.5%, Voltage Rating=100V, Case/Package=0805, Depth=1.25mm, Height=0.02inch, Lead Free="Lead Free", Length=0.079inch, Mount="Surface Mount", Number of Pins=2, Number of Terminations=2, Packaging="Tape and Reel", Power Rating=100mW, RoHS Compliant=Yes, Series=RR, Size Code=0805, Technology="THIN FILM", Termination=SMD/SMT, Voltage Rating (DC)=100V, Width=0.049inch
R4 R5 R6 R8 R10 R11 R12 R13 R14 R15 R16 R17 R18 R19 R20: library part CMP-2004-00982-1, Manufacturer="Vishay Dale", Part Number=CRCW0201220RFKED
R7 R9 R21: library part CMP-2000-01007-1, Manufacturer="KOA Speer", Resistance=5.6k, Part Number=RK73B1JTTD562J
SW1 SW2 SW3 SW5 SW6 SW7: "No Description Available", Mfr_Name="C&K Components", Copyright="Copyright (C) 2023 Ultra Librarian. All rights reserved.", Manufacturer_Part_Number="PTS815 SJM 250 SMTR LFS", RefDes=RefDes, Type=DEV
SW4: library part CMP-10038-000016-1, "SWITCH SLIDE DP3T 300MA 6V", Current Rating=300mA, Max Operating Temperature=85°C, Min Operating Temperature=-40°C, Voltage Rating (DC)=6V, Actuator Length=2mm, Actuator Material=Nylon, Actuator Type=Standard, Contact Material="Copper Alloy", Contact Plating=Silver, Electrical Life=5000Cycles, Mount="Surface Mount", Packaging="Cut Tape", RoHS Compliant=Yes, Switch Function=On-On-On, Switch Travel=2mm, Throw Configuration=DP3T
U1: library part IS31FL3194, "LED Driver with Programmable Pattern Sequencing 3-Channel 40mA 8-Pin WCSP T/R", Manufacturer=ISSI, Supplier Part Number 1=2521-IS31FL3194-CLS2-TRCT-ND, Manufacturer Part Number=IS31FL3194-CLS2-TR, Supplier 1=Digi-Key

## Free pads (board coordinates)
  round 4 hole 3: 1(0,-23) 1(0,103) 1(134,-23) 1(134,103)

## Via types
v1: diameter 0.25, hole 0.15, Top Layer to Bottom Layer, tented both sides, 677 vias

## Nets (pads, with @x,y where several pads share a name; then routed paths per layer and width w, separated by ;. In a path a pad name is that pad's centre, name@x,y a point inside that pad or via, vN(x,y) a via of type N, cw(c..) or ccw(c..) an arc to the next point about the centre after c; other vN are vias at no path point)
1V8: J4.6 J4.7 J10.7 J10.9 J12.1 J15.6 J15.7 | length 177.1
  Top Layer w0.4: J12.1@45,91 47.625,91 58.225,80.4 58.225,37.627 60.925,34.927 60.925,18.575 59.475,17.125 59.425,17.125 v1(58.9,16.6)
  Top Layer w1: v1(6.3,-8.5) 6.8,-8 6.9,-8 ; J10.9@11,-9.8 7.7,-9.8 6.9,-9 6.9,-8 ; J10.7@11,-7.26 7.64,-7.26 6.9,-8
  GND/PWR2 w0.4: v1(52.825,18.2) 53.012,18.388 ; v1(53.275,18.6) 53.225,18.6 53.012,18.388 ; 54,18.4 53.988,18.388 ; 54.5,18.4 54.488,18.388 53.988,18.388 ; 53.012,18.388 53.988,18.388
  GND/PWR2 w1: v1(6.3,-8.5) 55.1,-8.5 59.6,-4 59.6,15.5 56.7,18.4 54.5,18.4
ADS_A_DR: J2.17 J4.22 J15.22 | length 117.6
  Top Layer w0.15: J2.17@11,55.04 7.21,55.04 5.75,56.5 5.75,77.217 8.283,79.75 27.214,79.75 55.5,51.465 55.5,25.577 54.523,24.6 J4.22@53.275,24.6
  other v1: 52.825,24.6
ADS_B_DR: J2.15 J4.23 J15.23 | length 113.7
  Top Layer w0.15: J2.15@11,57.58 7.09,57.58 6,58.67 6,77.113 8.387,79.5 27.111,79.5 55.25,51.361 55.25,25.681 54.569,25 v1(53.275,25)
ADS_CLK_EXT: J3.28 J9.8 J14.28 | length 81.5
  Top Layer w0.15: v1(58.875,10) 59.5,10.625 59.5,15.121 63.879,19.5 v1(65.525,19.5) ; v1(116.741,-7.291) 119.969,-7.291 J9.8@120,-7.26
  Bottom Layer w0.15: v1(58.875,10) 62.5,10 64,8.5 68.521,8.5 84.312,-7.291 v1(116.741,-7.291)
ADS_START: J3.24 J9.4 J14.24 | length 80.1
  Top Layer w0.15: v1(58.5,11) 58.5,14.828 63.972,20.3 v1(65.525,20.3) ; v1(116.873,-2.165) 119.985,-2.165 J9.4@120,-2.18
  Bottom Layer w0.15: v1(58.5,11) 62.5,11 64.5,9 68.728,9 79.893,-2.165 v1(116.873,-2.165)
AVSS: J3.30 J9.10 J14.30 | length 80.7
  Top Layer w0.15: v1(60.325,9.5) 60,9.825 60,15.268 63.832,19.1 J3.30@65.56,19.1 ; v1(116.752,-9.79) 119.99,-9.79 J9.10@120,-9.8
  Bottom Layer w0.15: v1(60.325,9.5) 62.5,9.5 63.75,8.25 68.418,8.25 86.457,-9.79 v1(116.752,-9.79)
  other v1: 65.85,19.1
BIAS: J3.32 J9.12 J14.32 | length 81.2
  Top Layer w0.15: v1(60.5,9) 60.519,9.019 60.519,9.27 60.625,9.376 60.625,15.539 63.786,18.7 v1(65.525,18.7) ; v1(116.811,-12.371) 119.969,-12.371 J9.12@120,-12.34
  Bottom Layer w0.15: v1(60.5,9) 62.5,9 63.5,8 68.314,8 88.686,-12.371 v1(116.811,-12.371)
CSI_CLK_N: J3.17 J14.17
  other v1: 68.7,21.5
CSI_CLK_P: J3.19 J14.19
  other v1: 68.4,21.1
CSI_D0_N: J3.23 J14.23
  other v1: 68.4,20.3
CSI_D0_P: J3.25 J14.25
  other v1: 68.7,19.9
EXT_CHG/VUSB: J4.47 J4.48 J10.14 J10.16 J15.47 J15.48 | length 65.4
  Top Layer w1: J10.16@17.5,-17.42 17.555,-17.365 20.735,-17.365 21.6,-16.5 ; J10.14@17.5,-14.88 20.98,-14.88 21.6,-15.5 21.6,-16.5 ; v1(32.9,-14.1) 32.9,-14.2 30.6,-16.5 21.6,-16.5
  GND/PWR2 w0.3: v1(50.125,17) 50.525,17.4 v1(50.566,17.4)
  Bottom Layer w0.2: 49.6,17.1 49.849,17.1 49.939,17.01 50.335,17.01 J15.48@50.345,17 ; 49.776,17.4 J15.47@50.345,17.4
  Bottom Layer w0.3: 49.6,17.1 49.6,17.224 49.776,17.4
  Bottom Layer w0.4: 49.6,17.1 49.6,15.3 50.2,14.7
  Bottom Layer w1: v1(32.9,-14.1) 36.7,-14.1 49.4,-1.4 49.4,12.6 50.2,13.4 50.2,14.7
GAP_GPIO46: J3.29 J7.17 J9.9 J14.29 | length 139.3
  Top Layer w0.15: v1(68.7,19.1) 70.65,19.1 78.25,11.5 78.25,-0.75 87.3,-9.8 J9.9@113.5,-9.8 115.455,-9.8 115.825,-9.43 115.825,-8.925 116.25,-8.5 124,-8.5 125.75,-6.75 125.75,43.5 124.95,44.3 J7.17@124.95,54.5
GAP_GPIO46_JUMPER: J7.18 SW3.1 SW3.2 | length 23.9
  Top Layer w0.4: J7.18@124.95,61 124.95,78.7 125.4,79.15 SW3.2@131,79.15
GAP_GPIO47: J3.31 J7.19 J9.11 J14.31 | length 143.2
  Top Layer w0.15: J3.31@68.64,18.7 70.696,18.7 78,11.396 78,-0.854 87.196,-10.05 103.3,-10.05 105.59,-12.34 115.455,-12.34 115.825,-11.97 115.825,-11.675 116.25,-11.25 124,-11.25 126,-9.25 126,43.25 127.49,44.74 J7.19@127.49,54.5
  other v1: 68.415,18.675
GAP_GPIO47_JUMPER: IC3.1 J7.20 | length 38.7
  Top Layer w0.2: J7.20@127.49,61 127.49,67.115 134.625,74.25 134.625,88.775 131.325,92.075 130.025,92.075 129.8,91.85 129.8,90.35 IC3.1@129.7,90.25
GAP_GPIO48: J3.37 J9.17 J14.37 | length 67.5
  Top Layer w0.15: v1(68.7,17.5) 70.836,17.5 77.25,11.086 77.25,-1.164 86.886,-10.8 96.3,-10.8 105.46,-19.96 J9.17@113.5,-19.96
GAP_GPIO49: J3.39 J9.19 J14.39 | length 68.4
  Top Layer w0.15: J3.39@68.64,17.1 70.882,17.1 77,10.982 77,-1.268 86.782,-11.05 93.55,-11.05 105,-22.5 J9.19@113.5,-22.5
  other v1: 68.415,17.125
GAP_GPIO50: J3.33 J9.13 J14.33 | length 65.7
  Top Layer w0.15: v1(68.725,18.3) 70.743,18.3 77.75,11.293 77.75,-0.957 87.093,-10.3 101.3,-10.3 105.88,-14.88 J9.13@113.5,-14.88
GAP_GPIO51: J3.35 J9.15 J14.35 | length 66.7
  Top Layer w0.15: J3.35@68.365,17.863 68.365,17.875 68.39,17.9 v1(68.4,17.9) ; J3.35@68.64,17.9 70.789,17.9 77.5,11.189 77.5,-1.061 86.989,-10.55 98.8,-10.55 105.67,-17.42 J9.15@113.5,-17.42
GND: C1.2 C2.2 IC1.4 IC2.4 IC3.4 J1.15 J1.17 J1.19 J2.1 J2.2 J2.3 J2.4 J2.5 J2.6 J2.7 J2.8 J2.9 J2.10 J3.15 J3.21 J3.27 J4.8 J4.18 J4.33 J4.43 J7.7 J7.8 J8.5 J8.6 J9.1 J9.3 J9.5 J9.7 J10.5 J10.6 J11.3 J11.5 J12.3 J12.5 J12.9 J13.3 J13.5 J14.15 J14.21 J14.27 J15.8 J15.18 J15.33 J15.43 R1.1 R2.1 R3.1 R7.1 R9.1 R21.1 SW1.3 SW1.4 SW2.3 SW2.4 SW3.3 SW3.4 SW5.3 SW5.4 SW6.3 SW6.4 SW7.3 SW7.4 TP1.1 TP2.1 TP3.1 TP4.1 U1.D1
  other v1: -5,-25 5,-25 40,-25 45,-25 50,-25 55,-25 60,-25 65,-25 70,-25 75,-25 80,-25 90,-25 95,-25 100,-25 105,-25 110,-25 115,-25 120,-25 125,-25 130,-25 -2.5,-20 2.5,-20 32.5,-20 37.5,-20 42.5,-20 47.5,-20 52.5,-20 57.5,-20 62.5,-20 67.5,-20 72.5,-20 77.5,-20 127.5,-20 132.5,-20 137.5,-20 -5,-15 0,-15 5,-15 25,-15 30,-15 50,-15 55,-15 60,-15 65,-15 70,-15 75,-15 80,-15 125,-15 130,-15 135,-15 -2.5,-10 2.5,-10 37.5,-10 42.5,-10 47.5,-10 52.5,-10 57.5,-10 62.5,-10 67.5,-10 72.5,-10 77.5,-10 127.5,-10 132.5,-10 137.5,-10 -5,-5 0,-5 5,-5 25,-5 30,-5 40,-5 55,-5 60,-5 65,-5 70,-5 125,-5 130,-5 135,-5 -2.5,0 2.5,0 7.5,0 32.5,0 37.5,0 42.5,0 47.5,0 52.5,0 57.5,0 62.5,0 67.5,0 127.5,0 132.5,0 137.5,0 -5,5 0,5 5,5 10,5 15,5 20,5 30,5 40,5 55,5 75,5 80,5 85,5 90,5 95,5 100,5 105,5 110,5 115,5 120,5 125,5 130,5 135,5 71.806,6.806 -2.5,10 2.5,10 7.5,10 12.5,10 17.5,10 22.5,10 27.5,10 52.5,10 67.5,10 72.5,10 82.5,10 87.5,10 92.5,10 97.5,10 102.5,10 107.5,10 112.5,10 117.5,10 122.5,10 127.5,10 132.5,10 137.5,10 -5,15 0,15 5,15 55,15 65,15 70,15 80,15 85,15 130,15 135,15 50.55,19 52.825,19 68.4,19.5 -2.5,20 2.5,20 7.5,20 57.5,20 62.5,20 67.5,20 72.5,20 77.5,20 127.5,20 132.5,20 137.5,20 68.725,20.7 68.4,21.9 50.575,23 52.825,23 -5,25 0,25 130,25 135,25 -2.5,30 2.5,30 7.5,30 57.5,30 62.5,30 127.5,30 132.5,30 137.5,30 -5,35 0,35 60,35 65,35 70,35 75,35 80,35 130,35 135,35 -2.5,40 2.5,40 7.5,40 12.5,40 17.5,40 22.5,40 27.5,40 32.5,40 37.5,40 42.5,40 47.5,40 52.5,40 57.5,40 62.5,40 67.5,40 72.5,40 77.5,40 82.5,40 87.5,40 92.5,40 97.5,40 102.5,40 107.5,40 112.5,40 117.5,40 122.5,40 127.5,40 132.5,40 137.5,40 -5,45 0,45 10,45 15,45 20,45 25,45 30,45 35,45 40,45 45,45 50,45 65,45 70,45 75,45 80,45 85,45 90,45 95,45 100,45 105,45 110,45 115,45 120,45 130,45 135,45 -2.5,50 2.5,50 7.5,50 12.5,50 17.5,50 22.5,50 27.5,50 37.5,50 42.5,50 47.5,50 52.5,50 57.5,50 67.5,50 72.5,50 77.5,50 82.5,50 87.5,50 92.5,50 97.5,50 102.5,50 112.5,50 132.5,50 137.5,50 -5,55 0,55 35,55 40,55 45,55 50,55 55,55 60,55 65,55 70,55 75,55 95,55 100,55 130,55 135,55 -2.5,60 2.5,60 32.5,60 37.5,60 42.5,60 52.5,60 57.5,60 62.5,60 72.5,60 77.5,60 82.5,60 87.5,60 92.5,60 97.5,60 102.5,60 132.5,60 137.5,60 -5,65 0,65 25,65 30,65 35,65 40,65 45,65 50,65 55,65 60,65 65,65 70,65 80,65 85,65 90,65 95,65 100,65 130,65 135,65 -2.5,70 2.5,70 7.5,70 22.5,70 27.5,70 32.5,70 42.5,70 47.5,70 52.5,70 57.5,70 62.5,70 67.5,70 72.5,70 82.5,70 87.5,70 92.5,70 97.5,70 102.5,70 112.5,70 127.5,70 132.5,70 137.5,70 -5,75 0,75 25,75 30,75 35,75 40,75 45,75 50,75 55,75 60,75 65,75 80,75 85,75 90,75 95,75 100,75 110,75 115,75 130,75 -2.5,80 2.5,80 32.5,80 37.5,80 42.5,80 47.5,80 52.5,80 57.5,80 62.5,80 67.5,80 82.5,80 87.5,80 92.5,80 97.5,80 102.5,80 107.5,80 112.5,80 117.5,80 127.5,80 132.5,80 137.5,80 -5,85 0,85 5,85 10,85 15,85 25,85 30,85 35,85 40,85 45,85 50,85 55,85 60,85 65,85 70,85 75,85 80,85 100,85 110,85 115,85 120,85 125,85 -2.5,90 2.5,90 7.5,90 12.5,90 22.5,90 27.5,90 32.5,90 37.5,90 42.5,90 47.5,90 52.5,90 57.5,90 62.5,90 67.5,90 72.5,90 77.5,90 102.5,90 107.5,90 117.5,90 122.5,90 132.5,90 137.5,90 -5,95 0,95 20,95 25,95 30,95 35,95 50,95 55,95 60,95 80,95 85,95 90,95 95,95 100,95 105,95 115,95 120,95 125,95 130,95 135,95 -2.5,100 2.5,100 7.5,100 12.5,100 17.5,100 22.5,100 27.5,100 32.5,100 37.5,100 42.5,100 47.5,100 52.5,100 57.5,100 62.5,100 67.5,100 72.5,100 77.5,100 82.5,100 87.5,100 92.5,100 97.5,100 102.5,100 107.5,100 112.5,100 117.5,100 122.5,100 127.5,100 132.5,100 137.5,100 -5,105 5,105 10,105 15,105 20,105 30,105 35,105 40,105 45,105 50,105 60,105 65,105 70,105 75,105 80,105 90,105 95,105 100,105 105,105 110,105 115,105 120,105 125,105 130,105
I2C_A_SCL: J4.36 J8.12 J15.36 | length 34
  Top Layer w0.15: J8.12@17.5,25.16 44.34,25.16 47.7,21.8 v1(50.125,21.8)
I2C_A_SDA: J4.35 J8.10 J15.35 | length 34.9
  Top Layer w0.15: J8.10@17.5,27.7 42.154,27.7 47.654,22.2 J4.35@50.125,22.2
  other v1: 50.575,22.2
I2C_B_SCL: J2.20 J4.30 J7.1 J15.30 | length 128.8
  Top Layer w0.15: J2.20@17.5,52.5 30,52.5 33.5,49 33.5,46.927 ; v1(33.3,46.7) 33.3,46.727 33.5,46.927 ; 33.5,46.975 33.5,46.927 ; v1(50.125,24.2) 47.568,24.2 33.5,38.268 33.5,46.927 ; v1(60.15,46.675) 80.901,46.675 81.001,46.575 101.775,46.575 104.63,49.43 J7.1@104.63,54.5
  Bottom Layer w0.15: v1(33.3,46.7) 51.8,46.7 52,46.5 59.948,46.5 60.123,46.675 v1(60.15,46.675)
I2C_B_SCL_JUMPER: J7.2 U1.C1 | length 41.1
  Top Layer w0.15: U1.C1@87.325,91.525 87.325,90 87.953,89.372 87.953,89.166 v1(88.401,88.718) ; v1(88.336,86.262) 89.125,85.473 89.125,78.293 95.468,71.95 101.171,71.95 104.63,68.491 J7.2@104.63,61
  Bottom Layer w0.15: v1(88.336,86.262) 88.336,88.654 v1(88.401,88.718)
I2C_B_SDA: J4.32 J7.3 J8.4 J15.32 | length 122.5
  Top Layer w0.15: J8.4@17.5,35.32 35.741,35.32 47.661,23.4 v1(50.125,23.4) 51.1,23.4 51.7,24 51.7,34.1 53.2,35.6 53.2,45.7 v1(53.6,46.1) ; v1(60.5,46.275) 104.375,46.275 107.17,49.07 J7.3@107.17,54.5
  Bottom Layer w0.15: v1(53.6,46.1) 60.298,46.1 60.473,46.275 v1(60.5,46.275)
I2C_B_SDA_JUMPER: J7.4 U1.B1 | length 42.3
  Top Layer w0.15: U1.B1@86.925,91.525 86.925,89.925 87.596,89.254 87.596,89.237 87.646,89.187 v1(87.646,89.16) ; v1(87.875,87.3) 87.9,87.3 89.375,85.825 89.375,78.396 95.571,72.2 101.275,72.2 107.17,66.305 J7.4@107.17,61
  Bottom Layer w0.15: v1(87.646,89.16) 87.646,87.556 87.875,87.327 v1(87.875,87.3)
JTAG_T\R\S\T\: J1.3 J3.3 J14.3 R11.2 | length 135
  Top Layer w0.15: v1(68.4,24.325) J3.3@68.4,24.3 ; R11.2@79.65,96.065 79.7,96.065 80.15,96.065 81.2,95.015 81.2,69.899 64.6,53.299 64.6,52.4 59.85,47.65 59.85,38.3 66.175,31.975 67.725,30.425 67.725,24.575 68,24.3 J3.3@68.4,24.3 ; J1.3@113.5,35.32 85.174,35.32 74.154,24.3 J3.3@68.64,24.3 J3.3@68.4,24.3
JTAG_TCK: J1.5 J3.5 J14.5 R5.2 | length 125
  Top Layer w0.15: R5.2@66.525,92.24 65.215,92.24 64.05,91.075 64.05,52.65 59.35,47.95 59.35,38.093 65.821,31.621 67.05,30.393 67.05,24.6 67.75,23.9 J3.5@68.64,23.9 v1(68.7,23.9) 74.107,23.9 82.987,32.78 J1.5@113.5,32.78